# Altium PCB PCB1.PcbDoc (part 1 of 3)
Units mm, origin at the board's own origin, x right, y up, seen from the top; angles counter-clockwise.
Board outline 145 x 122 mm, 4 copper layers (Top Layer, Middle Layer 1, Middle Layer 2, Bottom Layer), stack 1.466 mm thick; 149 components, 242 nets, 995 pads, 740 vias.
Unrouted connection lines stored in the file: 53.
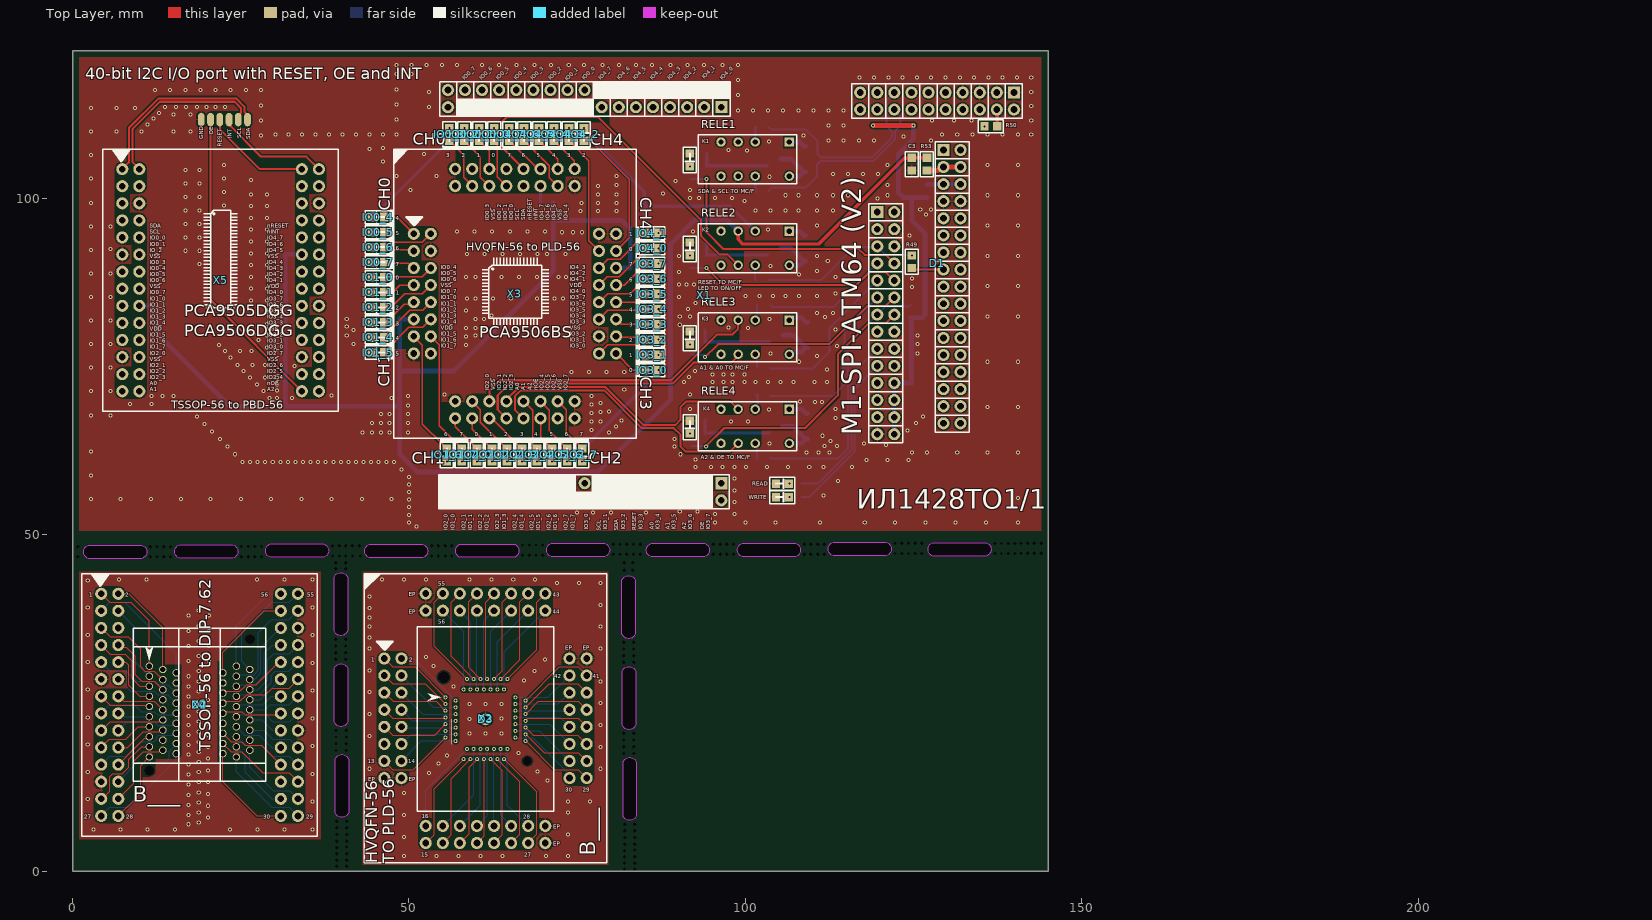
[diagram p0: Top Layer view]
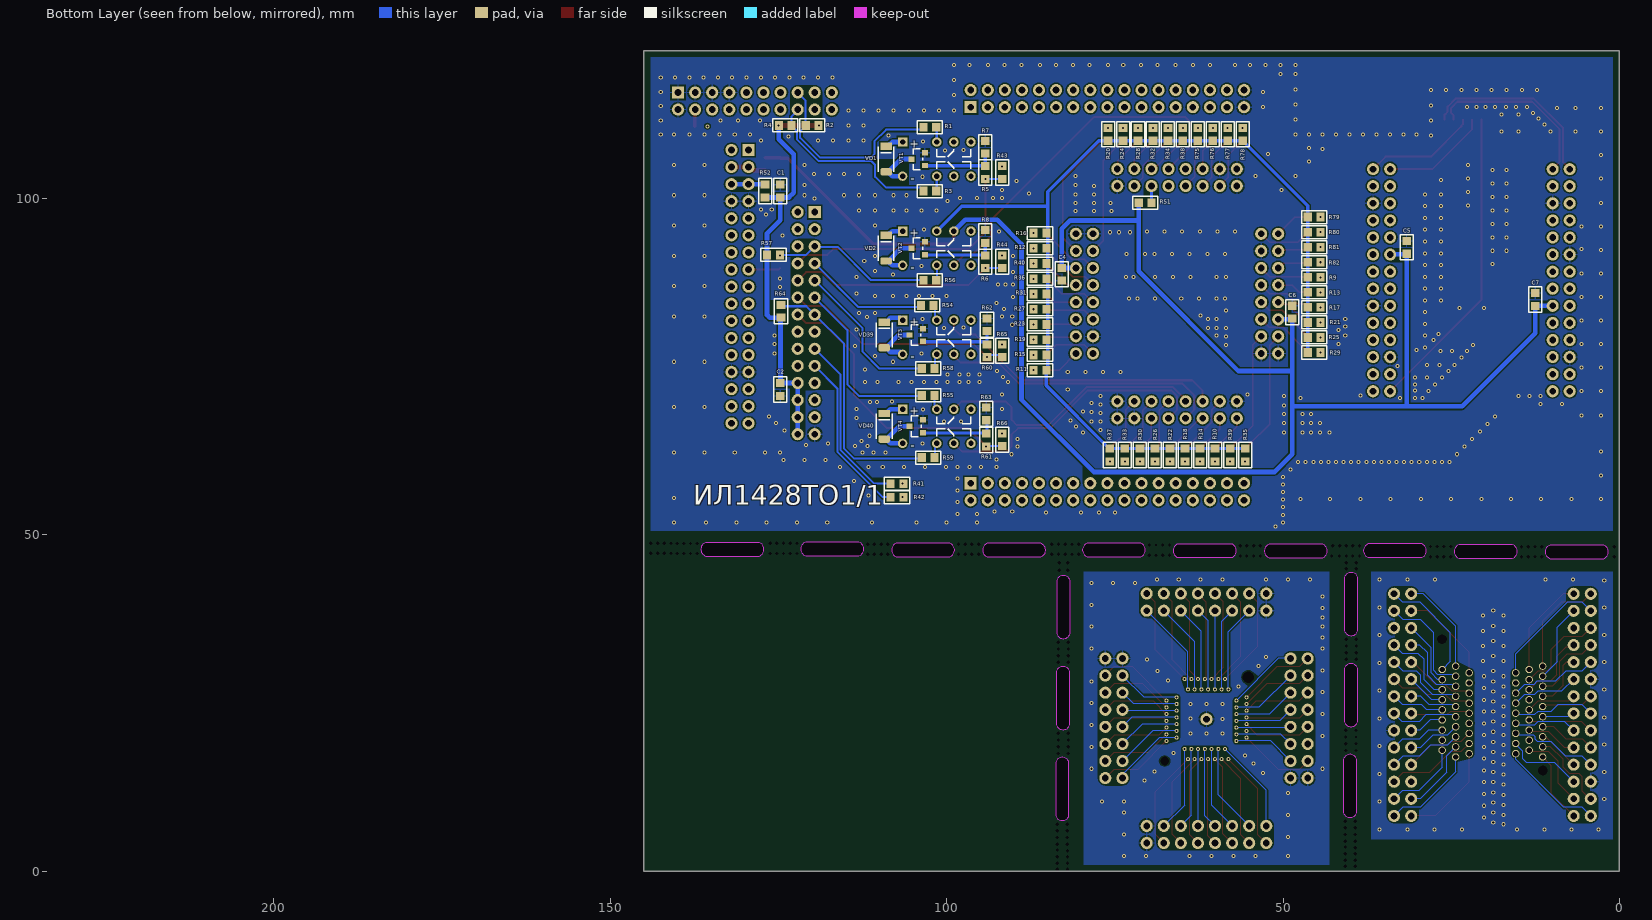
[diagram p1: Bottom Layer view, seen from below]
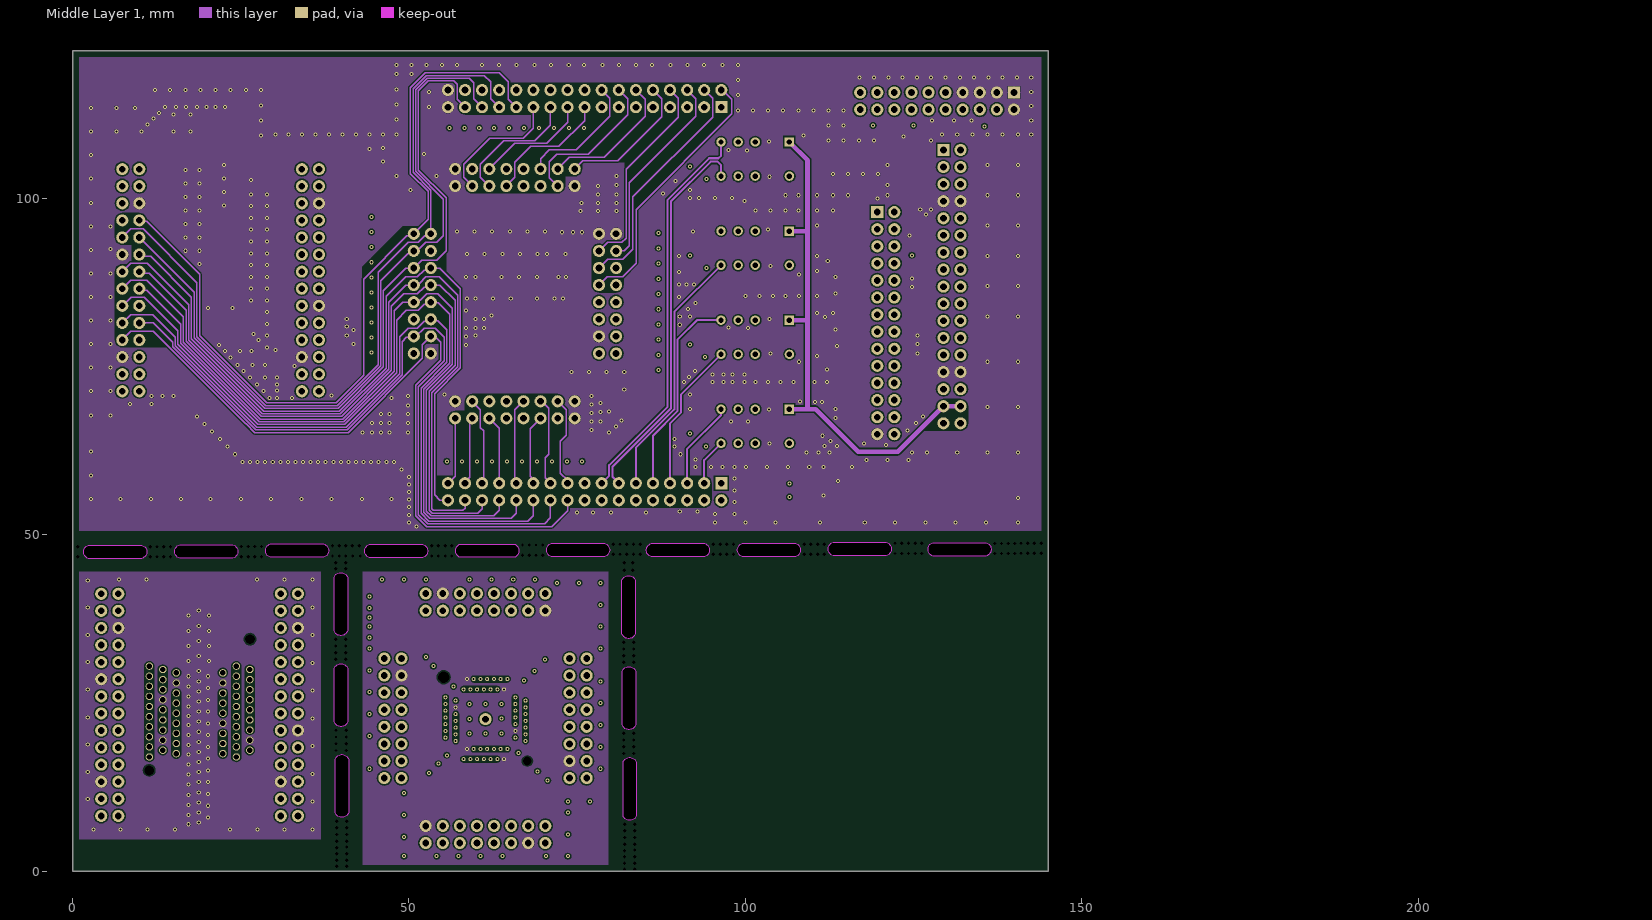
[diagram p2: Middle Layer 1]
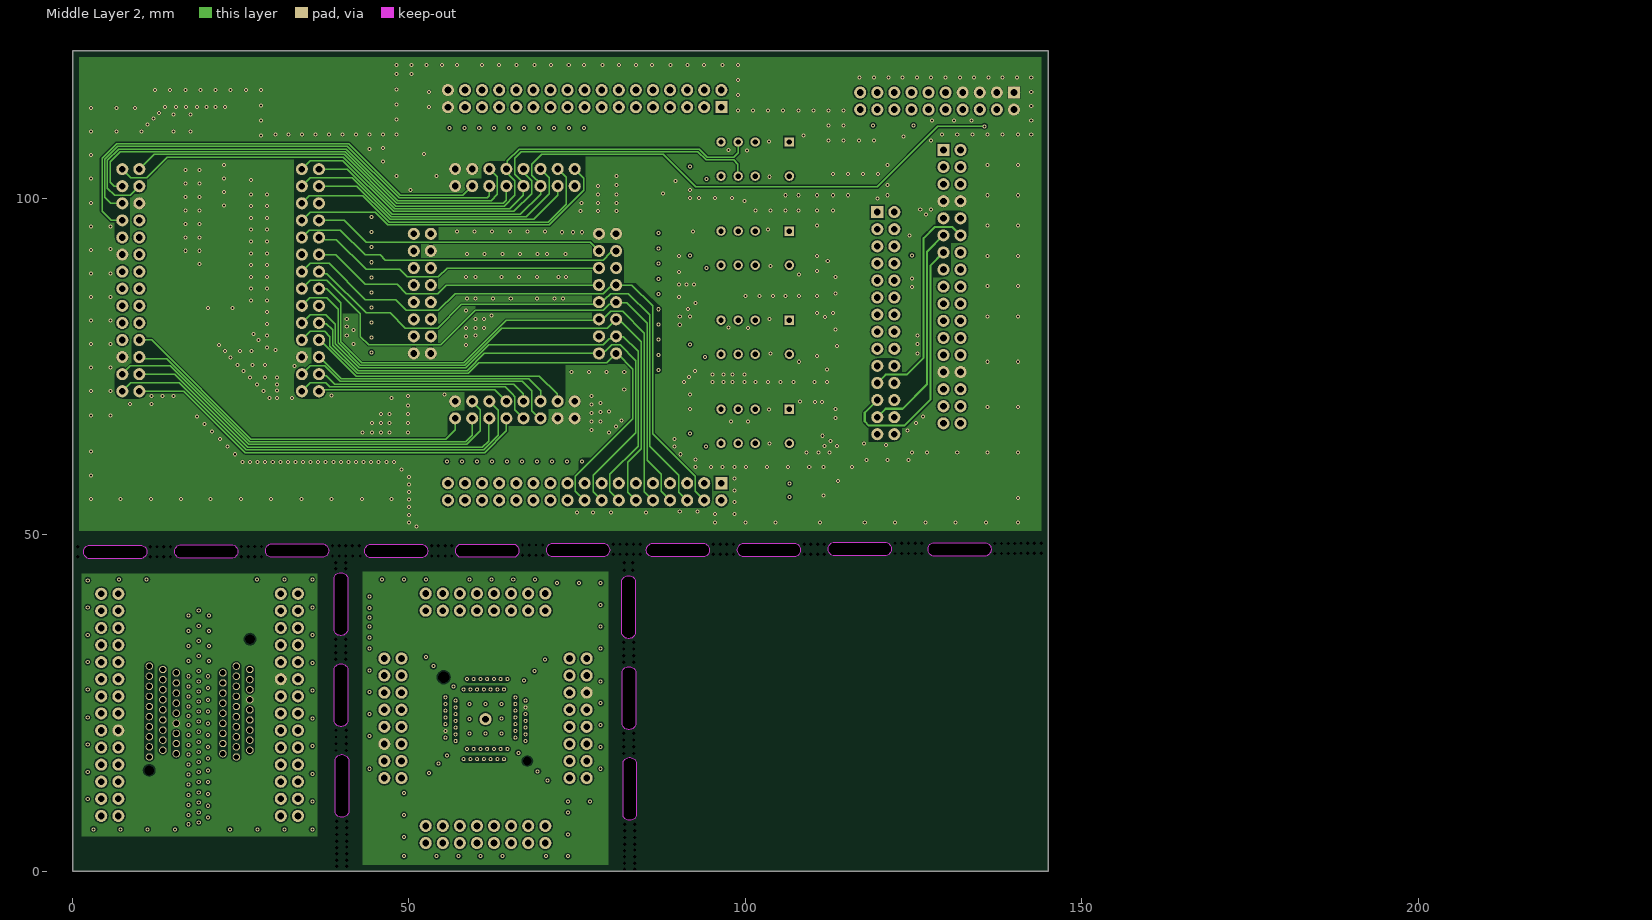
[diagram p3: Middle Layer 2]

## Layer stack, top to bottom
Top Solder: solder mask 0.025, Solder Resist, Dk 4
Top Layer: signal copper 0.018
Dielectric 2: prepreg 0.115, FR4 PR, Dk 4.2
Middle Layer 1: signal copper 0.018
Dielectric 1: core 1.164, FR4 Tg150, Dk 4.6
Middle Layer 2: signal copper 0.018
Dielectric 3: prepreg 0.115, FR4 PR, Dk 4.2
Bottom Layer: signal copper 0.018
Bottom Solder: solder mask 0.025, Solder Resist, Dk 4

## Board outline
0,0 145,0 145,122 0,122
cut-out: 83.815,8.273 cw(c82.815,8.615) 81.815,8.273 81.815,16.217 cw(c82.815,15.875) 83.815,16.217
cut-out: 83.69,21.773 cw(c82.69,22.115) 81.69,21.773 81.69,29.717 cw(c82.69,29.375) 83.69,29.717
cut-out: 83.653,35.307 cw(c82.653,35.649) 81.653,35.307 81.653,43.252 cw(c82.653,42.91) 83.653,43.252
cut-out: 135.82,48.869 cw(c135.478,47.869) 135.82,46.869 127.875,46.869 cw(c128.217,47.869) 127.875,48.869
cut-out: 93.945,48.744 cw(c93.603,47.744) 93.945,46.744 86,46.744 cw(c86.342,47.744) 86,48.744
cut-out: 107.479,48.781 cw(c107.137,47.781) 107.479,46.781 99.535,46.781 cw(c99.877,47.781) 99.535,48.781
cut-out: 120.979,48.906 cw(c120.637,47.906) 120.979,46.906 113.035,46.906 cw(c113.377,47.906) 113.035,48.906
cut-out: 52.07,48.619 cw(c51.728,47.619) 52.07,46.619 44.125,46.619 cw(c44.467,47.619) 44.125,48.619
cut-out: 65.604,48.656 cw(c65.262,47.656) 65.604,46.656 57.66,46.656 cw(c58.002,47.656) 57.66,48.656
cut-out: 79.104,48.781 cw(c78.762,47.781) 79.104,46.781 71.16,46.781 cw(c71.502,47.781) 71.16,48.781
cut-out: 37.335,48.664 cw(c36.993,47.664) 37.335,46.664 29.39,46.664 cw(c29.732,47.664) 29.39,48.664
cut-out: 23.835,48.539 cw(c23.493,47.539) 23.835,46.539 15.89,46.539 cw(c16.232,47.539) 15.89,48.539
cut-out: 10.3,48.502 cw(c9.958,47.502) 10.3,46.502 2.356,46.502 cw(c2.698,47.502) 2.356,48.502
cut-out: 40.864,35.752 cw(c39.864,36.094) 38.864,35.752 38.864,43.696 cw(c39.864,43.354) 40.864,43.696
cut-out: 40.901,22.217 cw(c39.901,22.559) 38.901,22.217 38.901,30.162 cw(c39.901,29.82) 40.901,30.162
cut-out: 41.026,8.717 cw(c40.026,9.059) 39.026,8.717 39.026,16.662 cw(c40.026,16.32) 41.026,16.662

## Design rules (kind name [scope] priority, off if disabled: settings)
Clearance [All] p1: gap=0.2 ignorepadtopadclearanceinfootprint=FALSE except(0: Arc-Hole Track-Hole SMDPad-Hole THPad-Hole Via-Hole Fill-Hole Poly-Hole Region-Hole Text-Hole; 0.1: Arc-SMDPad Arc-THPad Arc-Via Arc-Fill Arc-Region Arc-Text Track-SMDPad Track-THPad Track-Via Track-Fill Track-Region Track-Text)
ComponentClearance [All] p1: gap=0 collisioncheckmode=3 verticalgap=0 showdistances=FALSE
HoleToHoleClearance [All] p1: gap=0.2 allowstackedmicrovias=TRUE
MinimumSolderMaskSliver [All] p1: minsoldermaskwidth=0.15
PolygonConnect [OnLayer('Top Layer') OR OnLayer('Bottom Layer')] p1: thpad.connectstyle=Relief thpad.reliefconductorwidth=0.254 thpad.reliefentries=4 thpad.polygonreliefangle="90 Angle" thpad.airgapwidth=0.254 smdpad.connectstyle=Relief smdpad.reliefconductorwidth=0.254 smdpad.reliefentries=4 smdpad.polygonreliefangle="90 Angle" smdpad.airgapwidth=0.254 via.connectstyle=Direct via.reliefconductorwidth=0.254 via.reliefentries=4 via.polygonreliefangle="90 Angle" via.airgapwidth=0.254
RoutingVias [All] p1: holewidth=0.3 width=0.6 viastyle="Through Hole" minholewidth=0.3 minwidth=0.6 maxholewidth=0.6 maxwidth=1.2
SilkToSilkClearance [All] p1: silktosilkclearance=0
SilkToSolderMaskClearance [IsPad] p1: minsilkscreentomaskgap=0 clearancetoexposedcopper=TRUE
SolderMaskExpansion [All] p1: expansion=0.102 istentingtop=FALSE
Width [All] p1: maxlimit=0.7 minlimit=0.1 preferedwidth=0.3
25 further rules are at their usual default settings.

## Classes and differential pairs
component class UCP_s21: D3 X2 X3 X4 X5
component class RELE: K1 K2 K3 K4 R1 R2 R3 R4 R5 R6 R7 R8 R54 R55 R56 R57 R58 R59 R60 R61 R62 R63 R64 VD1 VD2 VD39 VD40 VT1 VT2 VT3 VT4
component class "Main Scheme": C1 C2 C3 C4 C5 C6 C7 D1 KP1 KP2 KP3 KP4 KP5 KP6 R49 R50 R51 R52 R53
component class LEDS: IO2_4 IO2_5 IO2_6 IO2_7 IO3_0 IO3_1 R9 R10 R11 R12 R13 R14 R15 R16 R17 R18 R19 R20 R21 R22 R23 R24 R25 R26 R27 R28 R29 R30 R31 R32 R33 R34 R35 R36 R37 R38 R39 R40 R41 R42 R43 R44 R65 R66 R75 R76 R77 R78 R79 R80 R81 R82 VD3 VD4 VD6 VD7 VD8 VD10 VD11 VD12 VD13 VD14 VD15 VD16 VD17 VD18 VD19 VD21 VD22 VD23 VD25 VD26 VD27 VD29 VD30 VD31 VD33 VD34 VD35 VD36 VD37 VD38 VD41 VD42 VD43 VD44 VD45 VD46 VD47 VD48 VD49 VD50
component class FK: X1

## Components (designator, comment, footprint, x,y, rotation, side; value= is the part's Value field where it differs from the comment)
C1 "10uF" 0805 124.75,101.125 r90 bottom
C2 "0.1uF" 0805 124.75,71.625 r270 bottom
C3 "10uF" 0805 124.75,105.125 r270 top
C4 "0.1uF" 0805 82.875,88.75 r270 bottom
C5 "0.1uF" 0805 31.625,92.75 r90 bottom
C6 "0.1uF" 0805 48.625,83.125 r90 bottom
C7 "0.1uF" 0805 12.5,85 r90 bottom
D1 "M1-SPI-ATM64(V2)" M1-SPI-ATM64(V2) 128.5,90.375 r270 top locked
D2 "PCA9505 TSSOP-56" OTS-56(64)-0.5-02 18.875,24.75 r0 top locked
D3 "PCA9506BS HVQFN56" 56QN50S18080 61.375,22.625 r90 top locked
GND "Contact" Contact 19.125,111.75 r90 top (schematic designator KP4)
INT "Contact" Contact 23.25,111.75 r90 top (schematic designator KP1)
IO0_0 "LED(0805)" 0805(LED) 62.667,109.55 r270 top (schematic designator VD43)
IO0_1 "LED(0805)" 0805(LED) 60.444,109.55 r270 top (schematic designator VD44)
IO0_2 "LED(0805)" 0805(LED) 58.222,109.55 r270 top (schematic designator VD45)
IO0_3 "LED(0805)" 0805(LED) 56,109.55 r270 top (schematic designator VD46)
IO0_4 "LED(0805)" 0805(LED) 45.375,97.25 r0 top (schematic designator VD47)
IO0_5 "LED(0805)" 0805(LED) 45.375,95.014 r0 top (schematic designator VD48)
IO0_6 "LED(0805)" 0805(LED) 45.375,92.778 r0 top (schematic designator VD49)
IO0_7 "LED(0805)" 0805(LED) 45.375,90.542 r0 top (schematic designator VD50)
IO1_0 "LED(0805)" 0805(LED) 45.375,88.306 r0 top (schematic designator VD3)
IO1_1 "LED(0805)" 0805(LED) 45.375,86.069 r0 top (schematic designator VD7)
IO1_2 "LED(0805)" 0805(LED) 45.375,83.833 r0 top (schematic designator VD11)
IO1_3 "LED(0805)" 0805(LED) 45.375,81.597 r0 top (schematic designator VD15)
IO1_4 "LED(0805)" 0805(LED) 45.375,79.361 r0 top (schematic designator VD19)
IO1_5 "LED(0805)" 0805(LED) 45.375,77.125 r0 top (schematic designator VD23)
IO1_6 "LED(0805)" 0805(LED) 55.625,61.897 r90 top (schematic designator VD27)
IO1_7 "LED(0805)" 0805(LED) 57.861,61.897 r90 top (schematic designator VD31)
IO2_0 "LED(0805)" 0805(LED) 60.097,61.897 r90 top (schematic designator VD4)
IO2_1 "LED(0805)" 0805(LED) 62.333,61.897 r90 top (schematic designator VD8)
IO2_2 "LED(0805)" 0805(LED) 64.569,61.897 r90 top (schematic designator VD12)
IO2_3 "LED(0805)" 0805(LED) 66.806,61.897 r90 top (schematic designator VD16)
IO2_4 "LED(0805)" 0805(LED) 69.042,61.897 r90 top (schematic designator VD20)
IO2_5 "LED(0805)" 0805(LED) 71.278,61.897 r90 top (schematic designator VD24)
IO2_6 "LED(0805)" 0805(LED) 73.514,61.897 r90 top (schematic designator VD28)
IO2_7 "LED(0805)" 0805(LED) 75.75,61.897 r90 top (schematic designator VD32)
IO3_0 "LED(0805)" 0805(LED) 86.125,74.5 r180 top (schematic designator VD5)
IO3_1 "LED(0805)" 0805(LED) 86.125,76.764 r180 top (schematic designator VD9)
IO3_2 "LED(0805)" 0805(LED) 86.125,79.028 r180 top (schematic designator VD13)
IO3_3 "LED(0805)" 0805(LED) 86.125,81.292 r180 top (schematic designator VD17)
IO3_4 "LED(0805)" 0805(LED) 86.125,83.556 r180 top (schematic designator VD21)
IO3_5 "LED(0805)" 0805(LED) 86.125,85.819 r180 top (schematic designator VD25)
IO3_6 "LED(0805)" 0805(LED) 86.125,88.083 r180 top (schematic designator VD29)
IO3_7 "LED(0805)" 0805(LED) 86.125,90.347 r180 top (schematic designator VD33)
IO4_0 "LED(0805)" 0805(LED) 86.125,92.611 r180 top (schematic designator VD6)
IO4_1 "LED(0805)" 0805(LED) 86.125,94.875 r180 top (schematic designator VD10)
IO4_2 "LED(0805)" 0805(LED) 76,109.55 r270 top (schematic designator VD14)
IO4_3 "LED(0805)" 0805(LED) 73.778,109.55 r270 top (schematic designator VD18)
IO4_4 "LED(0805)" 0805(LED) 71.556,109.55 r270 top (schematic designator VD22)
IO4_5 "LED(0805)" 0805(LED) 69.333,109.55 r270 top (schematic designator VD26)
IO4_6 "LED(0805)" 0805(LED) 67.111,109.55 r270 top (schematic designator VD30)
IO4_7 "LED(0805)" 0805(LED) 64.889,109.55 r270 top (schematic designator VD34)
K1 "V23079A1001B301 TE" V23079A1001B301 100.25,105.875 r180 top locked
K2 "V23079A1001B301 TE" V23079A1001B301 100.25,92.636 r180 top locked
K3 "V23079A1001B301 TE" V23079A1001B301 100.25,79.396 r180 top locked
K4 "V23079A1001B301 TE" V23079A1001B301 100.25,66.157 r180 top locked
OE "Contact" Contact 20.5,111.75 r90 top (schematic designator KP6)
R1 "100" 0805 102.5,110.625 r0 bottom
R2 "10k" 0805 120,110.875 r180 bottom
R3 "100" 0805 102.5,101.125 r0 bottom
R4 "10k" 0805 124,110.875 r0 bottom
R5 "4.7k" 0805 94.25,103.875 r90 bottom
R6 "4.7k" 0805 94.25,90.625 r90 bottom
R7 "20k" 0805 94.25,107.625 r90 bottom
R8 "20k" 0805 94.25,94.375 r90 bottom
R9 "2.2k" 0805 45.375,88.306 r180 bottom
R10 "2.2k" 0805 60.097,61.897 r270 bottom
R11 "2.2k" 0805 86.125,74.5 r0 bottom
R12 "2.2k" 0805 86.125,92.611 r0 bottom
R13 "2.2k" 0805 45.375,86.069 r180 bottom
R14 "2.2k" 0805 62.333,61.897 r270 bottom
R15 "2.2k" 0805 86.125,76.764 r0 bottom
R16 "2.2k" 0805 86.125,94.875 r0 bottom
R17 "2.2k" 0805 45.375,83.833 r180 bottom
R18 "2.2k" 0805 64.569,61.897 r270 bottom
R19 "2.2k" 0805 86.125,79.028 r0 bottom
R20 "2.2k" 0805 76,109.55 r90 bottom
R21 "2.2k" 0805 45.375,81.597 r180 bottom
R22 "2.2k" 0805 66.806,61.897 r270 bottom
R23 "2.2k" 0805 86.125,81.292 r0 bottom
R24 "2.2k" 0805 73.778,109.55 r90 bottom
R25 "2.2k" 0805 45.375,79.361 r180 bottom
R26 "2.2k" 0805 69.042,61.897 r270 bottom
R27 "2.2k" 0805 86.125,83.556 r0 bottom
R28 "2.2k" 0805 71.556,109.55 r90 bottom
R29 "2.2k" 0805 45.375,77.125 r180 bottom
R30 "2.2k" 0805 71.278,61.897 r270 bottom
R31 "2.2k" 0805 86.125,85.819 r0 bottom
R32 "2.2k" 0805 69.333,109.55 r90 bottom
R33 "2.2k" 0805 73.514,61.897 r270 bottom
R34 "2.2k" 0805 67.111,109.55 r90 bottom
R35 "2.2k" 0805 55.625,61.897 r270 bottom
R36 "2.2k" 0805 86.125,88.083 r0 bottom
R37 "2.2k" 0805 75.75,61.897 r270 bottom
R38 "2.2k" 0805 64.889,109.55 r90 bottom
R39 "2.2k" 0805 57.861,61.897 r270 bottom
R40 "2.2k" 0805 86.125,90.347 r0 bottom
R41 "2.2k" 0805 107.37,57.625 r180 bottom
R42 "2.2k" 0805 107.37,55.625 r180 bottom
R43 "2.2k" 0805 91.75,103.875 r90 bottom
R44 "2.2k" 0805 91.75,90.625 r90 bottom
R49 "100" 0805 124.75,90.625 r270 top
R50 "100" 0805 136.5,110.75 r180 top
R51 "10k" 0805 70.5,99.375 r0 bottom
R52 "1" 0805 127,101.125 r270 bottom
R53 "1" 0805 127,105.125 r90 top
R54 "100" 0805 102.875,84.125 r0 bottom
R55 "100" 0805 102.75,70.75 r0 bottom
R56 "100" 0805 102.5,87.875 r0 bottom
R57 "10k" 0805 125.75,91.625 r0 bottom
R58 "100" 0805 102.75,74.75 r0 bottom
R59 "100" 0805 102.75,61.5 r0 bottom
R60 "4.7k" 0805 94,77.375 r90 bottom
R61 "4.7k" 0805 94.125,64.125 r90 bottom
R62 "20k" 0805 94,81.25 r90 bottom
R63 "20k" 0805 94.125,68 r90 bottom
R64 "10k" 0805 124.625,83.25 r270 bottom
R65 "2.2k" 0805 91.75,77.396 r90 bottom
R66 "2.2k" 0805 91.75,64.157 r90 bottom
R75 "2.2k" 0805 62.667,109.55 r90 bottom
R76 "2.2k" 0805 60.444,109.55 r90 bottom
R77 "2.2k" 0805 58.222,109.55 r90 bottom
R78 "2.2k" 0805 56,109.55 r90 bottom
R79 "2.2k" 0805 45.375,97.25 r180 bottom
R80 "2.2k" 0805 45.375,95.014 r180 bottom
R81 "2.2k" 0805 45.375,92.778 r180 bottom
R82 "2.2k" 0805 45.375,90.542 r180 bottom
READ "LED(0805)" 0805(LED) 105.5,57.625 r180 top (schematic designator VD35)
RELE1 "LED(0805)" 0805(LED) 91.75,105.745 r90 top (schematic designator VD37)
RELE2 "LED(0805)" 0805(LED) 91.75,92.506 r90 top (schematic designator VD38)
RELE3 "LED(0805)" 0805(LED) 91.75,79.267 r90 top (schematic designator VD41)
RELE4 "LED(0805)" 0805(LED) 91.75,66.027 r90 top (schematic designator VD42)
RESET "Contact" Contact 21.875,111.75 r90 top (schematic designator KP5)
SCL "Contact" Contact 24.625,111.75 r90 top (schematic designator KP2)
SDA "Contact" Contact 26,111.75 r90 top (schematic designator KP3)
VD1 "LL4148 NXP" SOD80C 109,105.875 r90 bottom
VD2 "LL4148 NXP" SOD80C 109,92.625 r90 bottom
VD39 "LL4148 NXP" SOD80C 109.293,79.733 r90 bottom
VD40 "LL4148 NXP" SOD80C 109.28,66.157 r90 bottom
VT1 "MMBT5551L" SOT-23 104.25,105.875 r90 bottom
VT2 "MMBT5551L" SOT-23 104.25,92.625 r90 bottom
VT3 "MMBT5551L" SOT-23 104.543,79.733 r90 bottom
VT4 "MMBT5551L" SOT-23 104.53,66.157 r90 bottom
WRITE "LED(0805)" 0805(LED) 105.5,55.625 r180 top (schematic designator VD36)
X1 "FORMULA" FORMULA 84.25,84.375 r0 top locked
X2 "HVQFN-56 to PBD-56" "HVQFN-56 to PD-56" 61.375,22.75 r0 top locked
X3 "HVQFN-56 to PBD-56" "HVQFN-56 to PD-56" 65.75,85.875 r0 top locked
X4 "TSSOP-56 to DIP-7.62" "TSSOP-56 to DIP 7.62" 18.875,24.75 r0 top
X5 "TSSOP-56 to DIP-7.62" "TSSOP-56 to DIP 7.62" 22,87.875 r0 top locked

## Footprints (in the part's own frame and the unit in brackets; to place one, negate y for a bottom-side part, rotate by r counter-clockwise, add the part's x,y. Pads: shape width x height; smd on the part's side, far side on the other; paste and mask are expansions set on the pad)
56QN50S18080 [mm]
  round 0 hole 1.27 unplated: 0(-6.225,-6.225)
  round 0 hole 1.68 unplated: 0(6.225,6.225)
  round 0.6 hole 0.3: 1(3.25,5.955) 2(2.75,4.43) 3(2.25,5.955) 4(1.75,4.43) 5(1.25,5.955) 6(0.75,4.43) 7(0.25,5.955) 8(-0.25,4.43) 9(-0.75,5.955) 10(-1.25,4.43) 11(-1.75,5.955) 12(-2.25,4.43) 13(-2.75,5.955) 14(-3.25,4.43) 15(-5.955,3.25) 16(-4.43,2.75) 17(-5.955,2.25) 18(-4.43,1.75) 19(-5.955,1.25) 20(-4.43,0.75) 21(-5.955,0.25) 22(-4.43,-0.25) 23(-5.955,-0.75) 24(-4.43,-1.25) 25(-5.955,-1.75) 26(-4.43,-2.25) 27(-5.955,-2.75) 28(-4.43,-3.25) 29(-3.25,-5.955) 30(-2.75,-4.43) 31(-2.25,-5.955) 32(-1.75,-4.43) 33(-1.25,-5.955) 34(-0.75,-4.43) 35(-0.25,-5.955) 36(0.25,-4.43) 37(0.75,-5.955) 38(1.25,-4.43) 39(1.75,-5.955) 40(2.25,-4.43) 41(2.75,-5.955) 42(3.25,-4.43) 43(5.955,-3.25) 44(4.43,-2.75) 45(5.955,-2.25) 46(4.43,-1.75) 47(5.955,-1.25) 48(4.43,-0.75) 49(5.955,-0.25) 50(4.43,0.25) 51(5.955,0.75) 52(4.43,1.25) 53(5.955,1.75) 54(4.43,2.25) 55(5.955,2.75) 56(4.43,3.25)
  round 1.8 hole 1: 57(0,0)
  silkscreen extent -13.71,-10.16 13.72,10.16
0805 [mm]
  rect 1.2x1.3 smd: 1(-0.95,0) 2(0.95,0)
  silkscreen extent -1.87,-0.97 1.87,0.97, body extent -1.05,-0.63 0.95,0.63, height 0.55
0805(LED) [mm]
  rect 1.2x1.3 smd: 1(-0.95,0) 2(0.95,0)
  silkscreen extent -1.87,-0.97 1.87,0.97, body extent -1.03,-0.41 1.03,0.5, height 0.85
Contact [mm]
  oval 2x1 smd: 1(0,0)
FORMULA [mm]
  rect 1.8x1.8 hole 1: 1(12.18,29.22) VDDF(12.18,-26.68) VEEF(45.2,22.86)
  round 1.8 hole 1: 2(9.64,29.22) 3(7.1,29.22) 4(4.56,29.22) 5(2.02,29.22) 6(-0.52,29.22) 7(-3.06,29.22) 8(-5.6,29.22) 9(-8.14,29.22) 10(-10.68,29.22) 11(-13.22,29.22) 12(-15.76,29.22) 13(-18.3,29.22) 14(-20.84,29.22) 15(-23.38,29.22) 16(-25.92,29.22) 17(12.18,31.76) 18(9.64,31.76) 19(7.1,31.76) 20(4.56,31.76) 21(2.02,31.76) 22(-0.52,31.76) 23(-3.06,31.76) 24(-5.6,31.76) 25(-8.14,31.76) 26(-10.68,31.76) 27(-13.22,31.76) 28(-15.76,31.76) 29(-18.3,31.76) 30(-20.84,31.76) 31(-23.38,31.76) 32(-25.92,31.76) 33(-28.46,-29.22) 34(-25.92,-29.22) 35(-23.38,-29.22) 36(-20.84,-29.22) 37(-18.3,-29.22) 38(-15.76,-29.22) 39(-13.22,-29.22) 40(-10.68,-29.22) 41(-8.14,-29.22) 42(-5.6,-29.22) 43(-3.06,-29.22) 44(-0.52,-29.22) 45(2.02,-29.22) 46(4.56,-29.22) 47(7.1,-29.22) 48(9.64,-29.22) 49(-28.46,-26.68) 50(-25.92,-26.68) 51(-23.38,-26.68) 52(-20.84,-26.68) 53(-18.3,-26.68) 54(-15.76,-26.68) 55(-13.22,-26.68) 56(-10.68,-26.68) 57(-8.14,-26.68) 58(-5.6,-26.68) 59(-3.06,-26.68) 60(-0.52,-26.68) 61(2.02,-26.68) 62(4.56,-26.68) 63(7.1,-26.68) 64(9.64,-26.68) +5V(45.2,-15.24) +5V(47.74,-15.24) +5V_VCCF(45.2,20.32) +5V_VCCS(47.74,20.32) +5V_VDDF(45.2,17.78) +5V_VDDS(47.74,17.78) +12V(45.2,-12.7) +12V(47.74,-12.7) -12V(45.2,-17.78) -12V(47.74,-17.78) GND(-28.46,29.22) GND(-28.46,31.76) GND(45.2,-10.16) GND(45.2,15.24) GND(47.74,-10.16) GND(47.74,15.24) IN-OUT1(47.74,10.16) IN-OUT2(47.74,7.62) IN-OUT3(47.74,5.08) IN-OUT4(47.74,2.54) IN-OUT5(47.74,0) IN-OUT6(47.74,-2.54) IN-OUT7(47.74,-5.08) IN-OUT8(47.74,-7.62) NC(45.2,12.7) NC(47.74,12.7) OUT1(45.2,10.16) OUT2(45.2,7.62) OUT3(45.2,5.08) OUT4(45.2,2.54) OUT5(45.2,0) OUT6(45.2,-2.54) OUT7(45.2,-5.08) OUT8(45.2,-7.62) VDDS(12.18,-29.22) VEES(47.74,22.86)
  silkscreen extent -29.8,-30.51 49.02,32.97, body extent -29.79,-30.4 48.98,32.92, height 3
"HVQFN-56 to PD-56" [mm]
  round 1.8 hole 1: 1(-15.04,8.89) 2(-12.5,8.89) 3(-15.04,6.35) 4(-12.5,6.35) 5(-15.04,3.81) 6(-12.5,3.81) 7(-15.04,1.27) 8(-12.5,1.27) 9(-15.04,-1.27) 10(-12.5,-1.27) 11(-15.04,-3.81) 12(-12.5,-3.81) 13(-15.04,-6.35) 14(-12.5,-6.35) 15(-8.89,-18.54) 16(-8.89,-16) 17(-6.35,-18.54) 18(-6.35,-16) 19(-3.81,-18.54) 20(-3.81,-16) 21(-1.27,-18.54) 22(-1.27,-16) 23(1.27,-18.54) 24(1.27,-16) 25(3.81,-18.54) 26(3.81,-16) 27(6.35,-18.54) 28(6.35,-16) 29(15.04,-8.89) 30(12.5,-8.89) 31(15.04,-6.35) 32(12.5,-6.35) 33(15.04,-3.81) 34(12.5,-3.81) 35(15.04,-1.27) 36(12.5,-1.27) 37(15.04,1.27) 38(12.5,1.27) 39(15.04,3.81) 40(12.5,3.81) 41(15.04,6.35) 42(12.5,6.35) 43(8.89,18.54) 44(8.89,16) 45(6.35,18.54) 46(6.35,16) 47(3.81,18.54) 48(3.81,16) 49(1.27,18.54) 50(1.27,16) 51(-1.27,18.54) 52(-1.27,16) 53(-3.81,18.54) 54(-3.81,16) 55(-6.35,18.54) 56(-6.35,16) 57(-15.04,-8.89) 57(-12.5,-8.89) 57(-8.89,16) 57(-8.89,18.54) 57(8.89,-18.54) 57(8.89,-16) 57(12.5,8.89) 57(15.04,8.89)
  silkscreen extent -18,-21.5 18,21.5, body extent -16.25,-19.75 16.25,19.75, height 2.8
M1-SPI-ATM64(V2) [mm]
  rect 1.8x1.8 hole 1: 1X2(-25.4,11.43) 1X3(-7.62,-8.89)
  round 1.8 hole 1: 2X2(-22.86,11.43) 2X3(-7.62,-6.35) 3X2(-25.4,8.89) 3X3(-5.08,-8.89) 4X2(-22.86,8.89) 4X3(-5.08,-6.35) 5X2(-25.4,6.35) 5X3(-2.54,-8.89) 6X2(-22.86,6.35) 6X3(-2.54,-6.35) 7X2(-25.4,3.81) 7X3(0,-8.89) 8X2(-22.86,3.81) 8X3(0,-6.35) 9X2(-25.4,1.27) 9X3(2.54,-8.89) 10X2(-22.86,1.27) 10X3(2.54,-6.35) 11X2(-25.4,-1.27) 11X3(5.08,-8.89) 12X2(-22.86,-1.27) 12X3(5.08,-6.35) 13X2(-25.4,-3.81) 13X3(7.62,-8.89) 14X2(-22.86,-3.81) 14X3(7.62,-6.35) 15X2(-25.4,-6.35) 15X3(10.16,-8.89) 16X2(-22.86,-6.35) 16X3(10.16,-6.35) 17X2(-25.4,-8.89) 17X3(12.7,-8.89) 18X2(-22.86,-8.89) 18X3(12.7,-6.35) 19X2(-25.4,-11.43) 19X3(15.24,-8.89) 20X2(-22.86,-11.43) 20X3(15.24,-6.35) 21X3(17.78,-8.89) 22X3(17.78,-6.35) 23X3(20.32,-8.89) 24X3(20.32,-6.35) 25X3(22.86,-8.89) 26X3(22.86,-6.35) 27X3(25.4,-8.89) 28X3(25.4,-6.35)
  silkscreen extent -26.67,-12.7 26.67,12.7
OTS-56(64)-0.5-02 [mm]
  round 0 hole 1.45 unplated: 0(-7.5,-9.75) 0(7.5,9.75)
  round 1.1 hole 0.8: 1(-7.465,5.75) 2(-5.465,5.25) 3(-3.465,4.75) 4(-7.465,4.25) 5(-5.465,3.75) 6(-3.465,3.25) 7(-7.465,2.75) 8(-5.465,2.25) 9(-3.465,1.75) 10(-7.465,1.25) 11(-5.465,0.75) 12(-3.465,0.25) 13(-7.465,-0.25) 14(-5.465,-0.75) 15(-3.465,-1.25) 16(-7.465,-1.75) 17(-5.465,-2.25) 18(-3.465,-2.75) 19(-7.465,-3.25) 20(-5.465,-3.75) 21(-3.465,-4.25) 22(-7.465,-4.75) 23(-5.465,-5.25) 24(-3.465,-5.75) 25(-7.465,-6.25) 26(-5.465,-6.75) 27(-3.465,-7.25) 28(-7.465,-7.75) 29(5.465,-7.75) 30(3.465,-7.25) 31(7.465,-6.75) 32(5.465,-6.25) 33(3.465,-5.75) 34(7.465,-5.25) 35(5.465,-4.75) 36(3.465,-4.25) 37(7.465,-3.75) 38(5.465,-3.25) 39(3.465,-2.75) 40(7.465,-2.25) 41(5.465,-1.75) 42(3.465,-1.25) 43(7.465,-0.75) 44(5.465,-0.25) 45(3.465,0.25) 46(7.465,0.75) 47(5.465,1.25) 48(3.465,1.75) 49(7.465,2.25) 50(5.465,2.75) 51(3.465,3.25) 52(7.465,3.75) 53(5.465,4.25) 54(3.465,4.75) 55(7.465,5.25) 56(5.465,5.75)
  silkscreen extent -9.85,-11.35 9.85,11.35
SOD80C [mm]
  rrect50% 1.1x1.7 smd: 1(-1.9,0)
  rect 1.1x1.7 smd: 2(1.9,0)
  silkscreen extent -1.85,-1.17 1.85,1.17, body extent -1.9,-0.8 1.8,0.8, height 1.55
SOT-23 [mm]
  rect 0.8x0.9 smd: 1(-0.95,-1) 1(-0.95,-1) 2(0.95,-1) 2(0.95,-1) 3(0,1) 3(0,1)
  silkscreen extent -1.55,-0.72 1.55,0.7, body extent -1.5,-1.25 1.5,1.25, height 1.05
"TSSOP-56 to DIP 7.62" [mm]
  round 1.8 hole 1: 1(-14.62,16.51) 2(-12.08,16.51) 3(-14.62,13.97) 4(-12.08,13.97) 5(-14.62,11.43) 6(-12.08,11.43) 7(-14.62,8.89) 8(-12.08,8.89) 9(-14.62,6.35) 10(-12.08,6.35) 11(-14.62,3.81) 12(-12.08,3.81) 13(-14.62,1.27) 14(-12.08,1.27) 15(-14.62,-1.27) 16(-12.08,-1.27) 17(-14.62,-3.81) 18(-12.08,-3.81) 19(-14.62,-6.35) 20(-12.08,-6.35) 21(-14.62,-8.89) 22(-12.08,-8.89) 23(-14.62,-11.43) 24(-12.08,-11.43) 25(-14.62,-13.97) 26(-12.08,-13.97) 27(-14.62,-16.51) 28(-12.08,-16.51) 29(14.62,-16.51) 30(12.08,-16.51) 31(14.62,-13.97) 32(12.08,-13.97) 33(14.62,-11.43) 34(12.08,-11.43) 35(14.62,-8.89) 36(12.08,-8.89) 37(14.62,-6.35) 38(12.08,-6.35) 39(14.62,-3.81) 40(12.08,-3.81) 41(14.62,-1.27) 42(12.08,-1.27) 43(14.62,1.27) 44(12.08,1.27) 45(14.62,3.81) 46(12.08,3.81) 47(14.62,6.35) 48(12.08,6.35) 49(14.62,8.89) 50(12.08,8.89) 51(14.62,11.43) 52(12.08,11.43) 53(14.62,13.97) 54(12.08,13.97) 55(14.62,16.51) 56(12.08,16.51)
  silkscreen extent -17.5,-19.5 17.5,19.5, body extent -15.75,-17.79 15.75,18.27, height 5
V23079A1001B301 [mm]
  rect 1.4x1.4 hole 0.8: 1(-6.3,-2.54)
  round 1.4 hole 0.8: 3(-1.22,-2.54) 4(1.32,-2.54) 5(3.86,-2.54) 8(3.86,2.54) 9(1.32,2.54) 10(-1.22,2.54) 12(-6.3,2.54)
  silkscreen extent -7.4,-3.63 7.25,3.63, body extent -7.25,-3.6 7.25,3.6, height 9.4

## Part data
C1 C2 C3 C4 C5 C6 C7: library part C0805, ComponentHeigt=1.3, Firme=AVX, KIND=Конденсатор, Leadform=SMD, Packaging=0805
D2: library part "PCA9505DGG & PCA9506DGG"
D3: library part PCA9506BS
R1 R2 R3 R4 R5 R6 R7 R8 R9 R10 R11 R12 R13 R14 R15 R16 R17 R18 R19 R20 R21 R22 R23 R24 R25 R26 R27 R28 R29 R30 R31 R32 R33 R34 R35 R36 R37 R38 R39 R40 R41 R42 R43 R44 R49 R50 R51 R52 R53 R54 R55 R56 R57 R58 R59 R60 R61 R62 R63 R64 R65 R66 R75 R76 R77 R78 R79 R80 R81 R82: library part "R0805 Yageo", ComponentHeigt=0.6, Firme=Yageo, KIND=Резистор, Leadform=SMD, Packaging=0805
D1: ComponentHeigt=5.5, Name=Вилка, Specification="Вилка PLD2-2 *", Typ=PLD2-2
IO0_0 IO0_1 IO0_2 IO0_3 IO0_4 IO0_5 IO0_6 IO0_7 IO1_0 IO1_1 IO1_2 IO1_3 IO1_4 IO1_5 IO1_6 IO1_7 IO2_0 IO2_1 IO2_2 IO2_3 IO2_4 IO2_5 IO2_6 IO2_7 IO3_0 IO3_1 IO3_2 IO3_3 IO3_4 IO3_5 IO3_6 IO3_7 IO4_0 IO4_1 IO4_2 IO4_3 IO4_4 IO4_5 IO4_6 IO4_7 READ RELE1 RELE2 RELE3 RELE4 WRITE: ComponentHeigt=0.75, Firme=Kingbright, KIND="Светодиод L-1154GD Kingbright", Leadform="в отверстия", NN=24003000
VD1 VD2 VD39 VD40: Component Link=http://www.nxp.com, ComponentHeigt=1.6, Firme=NXP, KIND="Диод LL4148 NXP", Leadform=SMD, NN=24009301, Packaging=SOD-80C
VT1 VT2 VT3 VT4: ComponentHeigt=1.1, Firme=ONS, KIND="Транзистор MMBT5551L*G ONS", Leadform=SMD, NN=24007468, Packaging=SOT-23

## Free pads (board coordinates)
  round 0 hole 0.5 unplated: 38(0.75,48.25) 38(12.55,48.25) 38(26.085,48.287) 38(39.625,48.375) 38(40.613,33.502) 38(40.625,45) 38(40.625,45.875) 38(40.65,19.967) 38(40.75,2.625) 38(40.775,6.467) 38(42.625,48.375) 38(54.375,48.375) 38(67.875,48.5) 38(81.375,48.625) 38(83.25,44.75) 38(83.25,45.875) 38(83.402,33.057) 38(83.439,19.523) 38(83.539,2.181) 38(83.564,6.023) 38(84.375,48.625) 38(96.25,48.625) 38(109.75,48.625) 38(123.25,48.75) 38(126.25,48.75) 38(138.07,48.742) 38(141.973,48.767) 38(229.677,32.986) 39(11.55,48.25) 39(25.085,48.287) 39(38.625,48.375) 39(40.613,34.502) 39(40.65,20.967) 39(40.75,3.625) 39(40.775,7.467) 39(53.375,48.375) 39(66.875,48.5) 39(80.375,48.625) 39(83.402,34.057) 39(83.439,20.523) 39(83.539,3.181) 39(83.564,7.023) 39(95.25,48.625) 39(108.75,48.625) 39(122.25,48.75) 39(137.07,48.742) 39(140.973,48.767) 39(228.927,74.111) 41(0.75,46.75) 41(12.55,46.75) 41(13.55,46.75) 41(26.085,46.787) 41(27.085,46.787) 41(39.113,32.502) 41(39.113,33.502) 41(39.125,45) 41(39.125,45.875) 41(39.15,18.967) 41(39.15,19.967) 41(39.25,1.625) 41(39.25,2.625) 41(39.275,5.467) 41(39.275,6.467) 41(39.625,46.875) 41(40.625,46.875) 41(42.75,46.875) 41(54.375,46.875) 41(55.375,46.875) 41(67.875,47) 41(68.875,47) 41(81.375,47.125) 41(81.902,32.057) 41(81.902,33.057) 41(81.939,18.523) 41(81.939,19.523) 41(82,44.75) 41(82,45.875) 41(82.039,1.181) 41(82.039,2.181) 41(82.064,5.023) 41(82.064,6.023) 41(82.375,47.125) 41(84.375,47.125) 41(96.25,47.125) 41(97.25,47.125) 41(109.75,47.125) 41(110.75,47.125) 41(123.25,47.25) 41(124.25,47.25) 41(126.25,47.25) 41(138.07,47.242) 41(139.07,47.242) 41(141.973,47.267) 41(142.973,47.267) 41(229.677,31.361) 42(11.55,46.75) 42(25.085,46.787) 42(38.625,46.875) 42(39.113,34.502) 42(39.15,20.967) 42(39.25,3.5) 42(39.275,7.467) 42(53.375,46.875) 42(66.875,47) 42(80.375,47.125) 42(81.902,34.057) 42(81.939,20.523) 42(82.039,3.056) 42(82.064,7.023) 42(95.25,47.125) 42(108.75,47.125) 42(122.25,47.25) 42(137.07,47.242) 42(140.973,47.267) 42(228.927,72.486) 43(13.55,48.25) 43(14.55,46.75) 43(14.55,48.25) 43(27.085,48.287) 43(28.085,46.787) 43(28.085,48.287) 43(39.113,31.502) 43(39.15,17.967) 43(39.25,0.75) 43(39.275,4.467) 43(40.613,31.502) 43(40.613,32.502) 43(40.625,48.375) 43(40.65,17.967) 43(40.65,18.967) 43(40.75,0.75) 43(40.75,1.625) 43(40.775,4.467) 43(40.775,5.467) 43(41.585,48.412) 43(41.625,46.875) 43(55.375,48.375) 43(56.375,46.875) 43(56.375,48.375) 43(68.875,48.5) 43(69.875,47) 43(69.875,48.5) 43(81.902,31.057) 43(81.939,17.523) 43(82.039,0.306) 43(82.064,4.023) 43(82.375,48.625) 43(83.375,47.125) 43(83.375,48.625) 43(83.402,31.057) 43(83.402,32.057) 43(83.439,17.523) 43(83.439,18.523) 43(83.539,0.306) 43(83.539,1.181) 43(83.564,4.023) 43(83.564,5.023) 43(97.25,48.625) 43(98.25,47.125) 43(98.25,48.625) 43(110.75,48.625) 43(111.75,47.125) 43(111.75,48.625) 43(124.25,48.75) 43(125.25,47.25) 43(125.25,48.75) 43(139.07,48.742) 43(140.07,47.242) 43(140.07,48.742) 43(142.973,48.767) 43(143.973,47.267) 43(143.973,48.767)

## Via types
v1: diameter 0.6, hole 0.3, Top Layer to Bottom Layer, tented both sides, 740 vias

## Nets (pads, with @x,y where several pads share a name; then routed paths per layer and width w, separated by ;. In a path a pad name is that pad's centre, name@x,y a point inside that pad or via, vN(x,y) a via of type N, cw(c..) or ccw(c..) an arc to the next point about the centre after c; other vN are vias at no path point)
+5V_CONST: K1.1 K2.1 K3.1 K4.1 VD1.2 VD2.2 VD39.2 VD40.2 X1.+5V | length 87.7
  Middle Layer 1 w0.7: K3.1@106.55,81.936 109.17,81.936 ; K2.1@106.55,95.165 109.25,95.165 ; K1.1@106.55,108.415 109.25,105.715 109.25,95.165 ; K4.1@106.83,68.697 109.25,68.697 ; 110.46,68.665 116.75,62.375 122.69,62.375 126.75,66.435 X1.+5V@129.45,69.135 X1.+5V@131.99,69.135 ; 110.46,68.697 109.25,68.697 ; 109.25,68.697 109.25,81.936 109.25,82.346 109.25,95.165
  Bottom Layer w0.7: K2.1@106.55,95.165 108.09,95.165 108.5,94.755 108.5,94.725 108.7,94.525 VD2.2@109,94.525 ; K1.1@106.55,108.415 108.09,108.415 108.5,108.005 108.5,107.975 108.7,107.775 VD1.2@109,107.775 ; K4.1@106.83,68.697 108.37,68.697 108.78,68.287 108.78,68.257 108.98,68.057 VD40.2@109.28,68.057 ; K3.1@106.843,82.273 108.383,82.273 108.793,81.863 108.793,81.833 108.993,81.633 VD39.2@109.293,81.633
+5V_VCC: R53.1 X1.+5V_VCCF X1.+5V_VCCS | length 5.2
  Top Layer w0.7: R53.1@127,104.175 128.632,104.175 129.152,104.695 X1.+5V_VCCF@129.45,104.695 X1.+5V_VCCS@131.99,104.695
+5V_VDD: R52.1 X1.+5V_VDDF X1.+5V_VDDS | length 5
  Bottom Layer w0.7: R52.1@127,102.075 127.04,102.115 129.41,102.115 X1.+5V_VDDF@129.45,102.155 X1.+5V_VDDS@131.99,102.155
A0: K3.4 X3.20 X5.27 | length 111.6
  Top Layer w0.3: X3.20@61.94,69.875 61.94,71.44 63.5,73 88.984,73 95.75,79.766 98.016,79.766 98.93,80.68 K3.4@98.93,81.936 ; K3.4@98.621,81.931 98.621,82.246 98.648,82.273 K3.4@99.223,82.273
  Middle Layer 2 w0.2: X5.27@7.38,71.365 8.64,72.625 15.862,72.625 25.837,62.65 61.084,62.65 63.25,64.816 63.25,68.565 X3.20@61.94,69.875
A0_F: K3.5 X1.61 | length 30.5
  Middle Layer 1 w0.3: X1.61@86.27,57.695 86.27,64.774 89.95,68.454 89.95,79.075 92.811,81.936 K3.5@96.39,81.936
A0_KY: D2.27 X4.27 | length 15.5
  Bottom Layer w0.1: X4.27@4.255,8.24 5.515,9.5 8.25,9.5 15.41,16.66 D2.27@15.41,17.5
A0_KY2: D3.20 X2.20 | length 12.7
  Bottom Layer w0.1: X2.20@57.565,6.75 60.625,9.81 D3.20@60.625,18.195
A0_MC: D1.7X3 R54.2 | length 18.6
  Bottom Layer w0.3: R54.2@103.825,84.125 104.075,83.875 113.11,83.875 D1.7X3@119.61,90.375
A1: K3.9 X3.21 X5.28 | length 104.1
  Top Layer w0.3: X3.21@64.48,67.335 63.195,68.62 63.195,70.755 64.941,72.5 89.191,72.5 92.316,75.625 97.935,75.625 K3.9@99.223,76.913
  Middle Layer 2 w0.2: X5.28@9.92,71.365 16.557,71.365 25.672,62.25 61.25,62.25 64.48,65.48 X3.21@64.48,67.335
A1_F: K3.8 X1.62 | length 22.3
  Middle Layer 1 w0.3: X1.62@88.81,57.695 88.81,66.607 90.45,68.247 90.45,70.916 K3.8@96.39,76.856
A1_KY: D2.28 X4.28 | length 10.7
  Top Layer w0.1: X4.28@6.795,8.24 10.125,11.57 10.125,15.715 D2.28@11.41,17
A1_KY2: D3.21 X2.21 | length 12.9
  Top Layer w0.1: X2.21@60.105,4.21 61.155,5.26 61.155,16.64 D3.21@61.125,16.67
A1_MC: D1.9X3 R58.2 | length 23.4
  Bottom Layer w0.3: R58.2@103.7,74.75 110,74.75 112.5,77.25 112.5,80.725 D1.9X3@119.61,87.835
A2: K4.4 X3.22 X5.29 | length 69.5
  Top Layer w0.3: X3.22@64.48,69.875 64.48,70.105 66.375,72 79.207,72 84.832,66.375 89.625,66.375 90.35,67.1 90.35,68.975 91.25,69.875 97.752,69.875 K4.4@98.93,68.697
  Middle Layer 2 w0.2: X5.29@36.62,71.365 36.88,71.625 62.73,71.625 X3.22@64.48,69.875
A2_F: K4.5 X1.63 | length 13.1
  Middle Layer 1 w0.3: X1.63@91.35,57.695 91.35,62.787 96.377,67.814 96.377,68.684 K4.5@96.39,68.697
A2_KY: D2.29 X4.29 | length 14.1
  Bottom Layer w0.1: D2.29@24.34,17 24.34,14.785 29.625,9.5 32.235,9.5 X4.29@33.495,8.24
A2_KY2: D3.22 X2.22 | length 12.2
  Bottom Layer w0.1: X2.22@60.105,6.75 61.625,8.27 D3.22@61.625,18.311
A2_MC: D1.11X3 R55.2 | length 26.8
  Bottom Layer w0.3: R55.2@103.7,70.75 103.825,70.625 113,70.625 114.75,72.375 114.75,80.435 D1.11X3@119.61,85.295
DI1_MC: D1.21X3 X1.IN-OUT1 | length 32.9
  Middle Layer 2 w0.3: D1.21X3@119.61,72.595 120.86,73.845 123.97,73.845 126.5,76.375 126.5,94.125 128.16,95.785 130.74,95.785 X1.IN-OUT1@131.99,94.535
DO1_MC: D1.25X3 X1.OUT1 | length 32.6
  Middle Layer 2 w0.3: D1.25X3@119.61,67.515 120.86,68.765 123.39,68.765 127,72.375 127,92.085 X1.OUT1@129.45,94.535
DO2_MC: D1.23X3 X1.OUT2 | length 38.2
  Middle Layer 2 w0.3: D1.23X3@119.61,70.055 117.75,68.195 117.75,66.875 118.36,66.265 123.64,66.265 127.5,70.125 127.5,90.045 X1.OUT2@129.45,91.995
GND: C1.2 C2.2 C3.2 C4.2 C5.2 C6.2 C7.2 D1.1X2 D1.2X2 D1.3X2 D1.5X2 D1.7X2 D1.27X3 GND.1 R7.2 R8.2 R62.2 R63.2 READ.2 RELE1.2 RELE2.2 RELE3.2 RELE4.2 VT1.2 VT2.2 VT3.2 VT4.2 WRITE.2 X1.GND X3.4 X3.16 X3.27 X3.32 X3.44 X3.55 X3.57 X5.6 X5.11 X5.23 X5.34 X5.39 X5.51
  other v1: 51.125,51.25 50,51.875 95.5,51.875 100,51.875 104.5,51.875 111.125,51.875 117.75,51.875 122.25,51.875 126.75,51.875 131.25,51.875 135.75,51.875 140.5,51.875 50,53 95.5,53.125 98.375,53.125 75,53.375 77.375,53.375 80,53.375 85.25,53.375 90.25,53.5 92.875,53.5 50,54.125 98.375,54.875 50,55.25 2.75,55.375 7.125,55.375 11.625,55.375 16.125,55.375 20.5,55.375 25,55.375 29.5,55.375 34,55.375 38.5,55.375 43,55.375 47.375,55.375 140.5,55.5 111.625,55.875 50,56.375 98.375,56.625 50,57.5 113.75,58 98.375,58.375 50,58.625 2.75,58.875 48.875,59.75 92.625,60.125 94.875,60.125 96.625,60.125 98.375,60.125 100.125,60.125 103.25,60.125 106.375,60.125 109.5,60.125 111.625,60.125 115.875,60.125 25.25,60.875 26.375,60.875 27.5,60.875 28.625,60.875 29.75,60.875 30.875,60.875 32,60.875 33.125,60.875 34.25,60.875 35.375,60.875 36.5,60.875 37.625,60.875 38.75,60.875 39.875,60.875 41,60.875 42.125,60.875 43.25,60.875 44.375,60.875 45.5,60.875 46.625,60.875 47.75,60.875 118,61.125 121.125,61.125 124.25,61.125 92.625,61.25 24.125,62 90.375,62 109.125,62.25 110.875,62.25 112.5,62.25 124.75,62.25 127,62.25 131.5,62.25 136,62.25 140.5,62.25 2.75,62.375 23,63.125 89.5,63.125 111.75,63.25 113.625,63.25 120.875,63.375 103.625,63.625 117.625,63.625 112.625,64 21.875,64.25 89.5,64.25 111.5,64.75 43.125,65.25 44.5,65.25 45.875,65.25 47.125,65.25 49.875,65.25 79.75,65.25 20.75,65.375 124.125,65.5 77.125,65.625 80.75,66.125 19.625,66.5 44.5,66.625 45.875,66.625 47.125,66.625 49.875,66.625 125.375,66.625 77.125,66.875 78.5,66.875 97.875,66.875 100.375,66.875 81.625,67 113.375,67.375 18.5,67.625 126.375,67.625 2.75,67.75 5.625,67.75 45.875,68 47.125,68 49.875,68 77.125,68.125 78.5,68.25 79.75,68.375 103.5,68.625 91.75,68.75 113.375,68.75 136,69 140.5,69 49.875,69.25 77.125,69.375 8.5,69.5 11.75,69.5 78.5,69.625 110.375,69.75 111.375,69.75 108.125,69.875 29.25,70.375 30.375,70.375 32.625,70.375 47.375,70.375 11.75,70.625 13.375,70.625 15,70.625 49.875,70.625 77.125,70.625 38.5,70.75 55.25,70.875 91.75,70.875 2.75,71.375 5.625,71.375 28.375,71.375 30.375,71.5 82,71.625 27.375,72.375 30.375,72.375 90.875,72.75 95.125,72.75 96.75,72.75 98.125,72.75 99.875,72.75 101.5,72.75 103.375,72.75 105.25,72.75 107.125,72.75 110.25,72.75 112.125,72.75 26.375,73.375 28.625,73.375 30.375,73.375 91.625,73.5 95.125,73.875 96.75,73.875 98.125,73.875 99.875,73.875 74.125,74.25 76.75,74.25 79.375,74.25 82,74.25 25.375,74.375 92.5,74.375 112.125,74.625 2.75,74.875 5.625,74.875 33,75.125 24.5,75.25 26.75,75.25 28.625,75.25 108,75.75 136,75.75 140.5,75.75 23.5,76.375 110.625,76.625 103.75,77 125.625,77 22.625,77.375 24.875,77.375 26.625,77.375 30.125,77.5 28.875,77.875 113.625,78.125 21.75,78.25 58.5,78.25 2.75,78.375 5.625,78.375 41.75,78.375 125.625,78.375 27.625,79 58.5,79.5 28.875,79.625 40.75,79.625 59.875,79.625 125.625,79.625 26.875,79.875 41.75,80.5 113.423,80.54 58.5,80.75 59.875,80.75 61.125,80.75 100.375,80.75 97.5,80.875 40.75,81 90.25,81.25 28.875,81.375 2.75,81.875 5.625,81.875 40.75,82.125 59.875,82.125 61.125,82.125 103.625,82.125 111.875,82.375 90.25,82.5 91.75,82.5 136,82.5 140.5,82.5 62.25,82.625 110.625,83 113,83 28.875,83.125 58.5,83.375 91.5,83.625 20.125,83.75 23.75,83.75 92.625,84.5 26.5,84.875 28.875,84.875 58.627,85.123 59.877,85.123 62.502,85.123 65.127,85.123 69.002,85.123 71.627,85.123 72.877,85.123 2.75,85.375 5.625,85.375 90.125,85.375 100,85.5 102.125,85.5 104.125,85.5 106,85.5 108,85.5 110.625,85.5 113.375,85.875 26.5,86.625 28.875,86.625 124.75,86.875 136,87 140.5,87 90.125,87.25 91.25,87.25 92.375,87.25 124.75,88.125 26.5,88.375 28.875,88.375 58.5,88.375 59.875,88.375 63.75,88.375 66.375,88.375 69,88.375 72.25,88.375 73.375,88.375 113.375,88.375 108,88.75 2.75,88.875 5.625,88.875 90.125,89.125 110.625,89.25 103.75,90 26.5,90.125 28.875,90.125 18.875,90.25 112.25,90.75 90.125,91.5 110.625,91.5 136,91.5 140.5,91.5 58.625,91.75 61.25,91.75 63.875,91.75 66.5,91.75 69.125,91.75 70.5,91.75 73.25,91.75 26.5,91.875 28.875,91.875 16.75,92.25 18.875,92.25 2.75,92.375 5.625,92.5 26.5,93.625 28.875,93.625 16.75,94.25 18.875,94.25 124.375,94.5 72.75,95 74.375,95 75.75,95 57.125,95.125 59.75,95.125 62.375,95.125 65,95.125 67.625,95.125 70.25,95.125 92.25,95.125 26.5,95.375 28.875,95.375 103.375,95.375 2.75,95.875 5.625,95.875 110.625,96 136,96 140.5,96 16.75,96.25 18.875,96.25 26.5,97.125 28.875,97.125 126.875,97.625 75.5,98.125 78.125,98.125 80.875,98.125 16.75,98.25 18.875,98.25 101.5,98.25 103.75,98.25 106,98.25 107.875,98.25 110.625,98.25 113,98.25 126,98.375 127.625,98.375 26.5,98.875 28.875,98.875 22.5,99 2.75,99.375 75.625,99.375 78.125,99.375 80.875,99.375 99.875,99.625 119.625,100 91.75,100.125 93.125,100.125 95.5,100.125 98,100.125 16.75,100.25 18.875,100.25 106,100.5 107.875,100.5 110.625,100.5 113,100.5 115.25,100.5 121.125,100.5 136,100.5 140.5,100.5 26.5,100.625 28.875,100.625 78.125,100.625 80.875,100.625 87.75,100.75 22.5,101 50.25,101.25 91.75,101.25 78.125,101.875 80.875,102 121.125,102 16.75,102.25 18.875,102.25 89.625,102.625 26.5,102.75 2.75,103 22.5,103 103.625,103.25 48.125,103.375 54.125,103.375 80.875,103.375 113,103.625 115.25,103.625 117.5,103.625 119.75,103.625 16.75,104.25 18.875,104.25 22.5,105 121.125,105 136,105 140.5,105 46.125,105.5 2.75,106.5 52.25,106.625 100.25,107.125 97.5,107.25 44.125,107.375 46.125,107.5 103.5,108.5 112.375,108.625 114.625,108.625 116.875,108.625 119.125,108.625 127.625,108.625 123.5,109.25 28,109.375 108.625,109.375 30.125,109.5 32.125,109.5 34.125,109.5 36.125,109.5 38.125,109.5 40.125,109.5 42.125,109.5 44.125,109.5 46.125,109.5 48.125,109.5 129.25,109.5 131.5,109.5 133.75,109.5 136,109.5 138.25,109.5 140.5,109.5 142.5,109.5 2.75,110 6.5,110 10.25,110 15,110 17.5,110 112.375,110.875 114.625,110.875 11.125,111 28,111.625 127.75,111.625 131,111.625 133.625,111.625 142.5,111.625 48.125,111.75 12,111.875 15,112.5 17.5,112.5 12.875,112.75 98.875,113.125 101.125,113.125 103.375,113.125 105.625,113.125 107.875,113.125 110.125,113.125 112.375,113.125 114.625,113.125 2.75,113.5 6.5,113.5 9.25,113.5 13.75,113.625 15.375,113.625 16.875,113.625 18.5,113.625 19.875,113.625 21.25,113.625 22.625,113.625 53,113.625 142.5,113.75 28,113.875 48.125,114 98.875,115.375 53,115.875 142.5,115.875 12.25,116.125 14.5,116.125 16.75,116.125 19,116.125 21.25,116.125 23.5,116.125 25.75,116.125 28,116.125 48.125,116.25 98.875,117.625 117,118 119.125,118 121.25,118 123.375,118 125.5,118 127.625,118 129.75,118 131.875,118 134,118 136.125,118 138.25,118 140.375,118 142.5,118 48.125,118.5 50.375,118.5 48.125,119.875 50.375,119.875 52.625,119.875 54.875,119.875 57.125,119.875 60.875,119.875 63.375,119.875 66,119.875 68.625,119.875 71.125,119.875 73.75,119.875 76,119.875 78.75,119.875 81.25,119.875 83.75,119.875 86.125,119.875 88.875,119.875 91.375,119.875 93.875,119.875 96.625,119.875 98.875,119.875
GND_KY2: D3.57 X2.57
  other v1: 49.25,2.25 54.125,2.25 57.375,2.25 60.625,2.25 63.875,2.25 70.375,2.25 73.625,2.25 49.25,5.125 73.625,5.5 49.25,8.375 73.625,8.75 73.625,10.375 76.875,10.375 49.25,11.625 70.625,13.5 53,14.625 69.125,14.875 44.125,15.25 78.5,15.25 54.375,16 55.625,17.25 66.25,17.625 78.5,18.5 44.125,20.125 59,20.5 61.375,20.5 63.75,20.5 78.5,21.75 59,22.625 63.75,22.75 44.125,23.375 59,24.875 61.375,24.875 63.75,24.875 78.5,25 44.125,26.625 56.625,27.5 78.5,28.25 67.125,28.375 68.625,29.75 44.125,29.875 53.625,30.5 70.25,31.5 52.5,31.875 44.125,33.125 78.5,33.125 44.125,34.75 44.125,36.375 78.5,36.375 44.125,37.75 44.125,39.125 78.5,39.625 44.125,40.875 72,42.875 75.25,42.875 78.5,42.875 46,43.375 49.25,43.375 52.5,43.375 59,43.375 62.25,43.375 65.5,43.375 68.75,43.375
INT_MC: D1.4X2 R50.1 | length 2.5
  Top Layer w0.5: D1.4X2@137.39,113.235 137.42,113.205 137.42,110.78 R50.1@137.45,110.75
INT_PCA: INT.1 R50.2 R51.1 X3.48 X5.55 | length 134.9
  Top Layer w0.3: INT.1@23.25,111.75 23.25,111.061 23.497,110.814 23.497,110.753 28,106.25 34.755,106.25 X5.55@36.62,104.385
  Middle Layer 2 w0.2: X5.55@36.62,104.385 40.852,104.385 47.537,97.7 66.575,97.7 69.56,100.685 69.56,102.19 68.25,103.5 68.25,105.125 69.7,106.575 87.8,106.575 92.625,101.75 119.625,101.75 128.625,110.75 v1(135.55,110.75)
  Bottom Layer w0.5: R51.1@69.55,99.375 69.555,99.38 69.555,101.87 X3.48@69.56,101.875
INT_PCA_KY: D2.55 X4.55 | length 16.8
  Bottom Layer w0.1: D2.55@26.34,30 25.125,31.215 25.125,35.5 29.625,40 32.235,40 X4.55@33.495,41.26
INT_PCA_KY2: D3.48 X2.48 | length 12.8
  Bottom Layer w0.1: D3.48@62.125,27.19 62.125,35.69 X2.48@65.185,38.75
IO0_0: IO0_0.2 X1.9 X3.52 X5.3 | length 96.6
  Top Layer w0.2: IO0_0.2@62.667,108.6 63.125,108.142 63.125,103.23 X3.52@64.48,101.875
  Middle Layer 1 w0.2: X3.52@64.48,101.875 65.75,103.145 65.75,105.402 68.098,107.75 72.25,107.75 76.11,111.61 X1.9@76.11,113.595
  Middle Layer 2 w0.2: X5.3@7.38,101.845 6.155,101.845 5.575,102.425 5.575,105.503 7.047,106.975 40.525,106.975 48.2,99.3 64.009,99.3 64.48,99.771 X3.52@64.48,101.875
IO0_0_KY: D2.3 X4.3 | length 17.7
  Bottom Layer w0.1: X4.3@4.255,38.72 5.535,40 7.75,40 15.41,32.34 D2.3@15.41,29.5
IO0_0_KY2: D3.52 X2.52 | length 11.6
  Bottom Layer w0.1: D3.52@60.105,27.172 X2.52@60.105,38.75
IO0_1: IO0_1.2 X1.10 X3.53 X5.4 | length 97.9
  Top Layer w0.2: IO0_1.2@60.444,108.6 60.494,108.6 60.994,108.1 60.994,108.05 61.94,107.104 X3.53@61.94,104.415
  Middle Layer 1 w0.2: X3.53@61.94,104.415 65.725,108.2 70.45,108.2 73.57,111.32 X1.10@73.57,113.595
  Middle Layer 2 w0.2: X5.4@9.92,101.845 8.575,100.5 6.25,100.5 5.175,101.575 5.175,105.669 6.881,107.375 40.691,107.375 48.366,99.7 62.2,99.7 63.125,100.625 63.125,103.23 X3.53@61.94,104.415
IO0_1_KY: D2.4 X4.4 | length 11.6
  Bottom Layer w0.1: X4.4@6.795,38.72 9.224,36.291 9.224,31.186 D2.4@11.41,29
IO0_1_KY2: D3.53 X2.53 | length 14.7
  Top Layer w0.1: X2.53@57.565,41.29 56.25,39.975 56.25,31.955 D3.53@59.625,28.58
IO0_2: IO0_2.2 X1.11 X3.54 X5.5 | length 98.9
  Top Layer w0.2: IO0_2.2@58.222,108.6 58.272,108.6 58.772,108.1 58.772,108.05 60.625,106.197 60.625,103.19 X3.54@61.94,101.875
  Middle Layer 1 w0.2: X3.54@61.94,101.875 60.625,103.19 60.625,105.125 64.1,108.6 68.725,108.6 71.03,110.905 X1.11@71.03,113.595
  Middle Layer 2 w0.2: X5.5@7.38,99.305 7.357,99.328 5.672,99.328 4.775,100.225 4.775,105.834 6.716,107.775 40.856,107.775 48.531,100.1 58.191,100.1 58.216,100.125 61.625,100.125 61.94,100.44 X3.54@61.94,101.875
IO0_2_KY: D2.5 X4.5 | length 13.9
  Top Layer w0.1: X4.5@4.255,36.18 5.56,34.875 8.25,34.875 10.125,33 10.125,30.375 10.75,29.75 12.16,29.75 D2.5@13.41,28.5
IO0_2_KY2: D3.54 X2.54 | length 12.2
  Bottom Layer w0.1: X2.54@57.565,38.75 59.125,37.19 D3.54@59.125,27.162
IO0_3: IO0_3.2 X1.12 X3.56 X5.7 | length 98.8
  Top Layer w0.2: IO0_3.2@56,108.6 56.05,108.6 56.55,108.1 56.55,108.05 58.125,106.475 58.125,103.15 X3.56@59.4,101.875
  Middle Layer 1 w0.2: X3.56@59.4,101.875 58.125,103.15 58.125,105.125 62,109 67,109 68.49,110.49 X1.12@68.49,113.595
  Middle Layer 2 w0.2: X5.7@7.38,96.765 5.735,96.765 4.375,98.125 4.375,106 6.55,108.175 41.022,108.175 48.697,100.5 58.025,100.5 X3.56@59.4,101.875
IO0_3_KY: D2.7 X4.7 | length 11.2
  Top Layer w0.1: X4.7@4.255,33.64 5.595,32.3 7.825,32.3 8.875,31.25 8.875,28.625 10,27.5 D2.7@11.41,27.5
IO0_3_KY2: D3.56 X2.56 | length 13
  Bottom Layer w0.1: X2.56@55.025,38.75 58.125,35.65 D3.56@58.125,27.055
IO0_4: IO0_4.2 X1.13 X3.1 X5.8 | length 125.9
  Top Layer w0.2: IO0_4.2@46.039,97.25 48.225,97.25 X3.1@50.71,94.765
  Middle Layer 1 w0.2: X5.8@9.92,96.765 10.063,96.622 11.003,96.622 18.875,88.75 18.875,79.625 28.875,69.625 39.152,69.625 43.25,73.723 43.25,88.051 49.688,94.489 50.434,94.489 52.85,96.905 52.85,101.078 50.2,103.728 50.2,116.499 52.401,118.7 63.425,118.7 64.755,117.37 64.755,114.79 X1.13@65.95,113.595
IO0_4_KY: D2.8 X4.8 | length 11
  Top Layer w0.1: X4.8@6.795,33.64 7.12,33.315 7.935,33.315 9.291,31.959 9.291,29.209 10.25,28.25 12.16,28.25 D2.8@13.41,27
IO0_4_KY2: D3.1 X2.1 | length 11.5
  Top Layer w0.1: X2.1@46.335,31.64 47.6,30.375 50.92,30.375 D3.1@55.405,25.89
IO0_5: IO0_5.2 X1.14 X3.2 X5.9 | length 128.4
  Top Layer w0.2: IO0_5.2@46.325,95.014 46.325,94.964 46.825,94.464 46.875,94.464 47.839,93.5 51.985,93.5 X3.2@53.25,94.765
  Middle Layer 1 w0.2: X5.9@7.38,94.225 8.655,95.5 10.5,95.5 18.475,87.525 18.475,79.459 28.709,69.225 39.318,69.225 45.4,75.307 45.4,89.025 49.875,93.5 51.375,93.5 52.334,94.459 52.944,94.459 X3.2@53.25,94.765 53.25,101.244 50.6,103.894 50.6,116.334 52.566,118.3 61.2,118.3 62.125,117.375 62.125,114.88 X1.14@63.41,113.595
IO0_5_KY: D2.9 X4.9 | length 13.1
  Bottom Layer w0.1: X4.9@4.255,31.1 5.605,29.75 8,29.75 9.5,28.25 12.25,28.25 12.75,27.75 14.16,27.75 D2.9@15.41,26.5
IO0_5_KY2: D3.2 X2.2 | length 10.7
  Bottom Layer w0.1: X2.2@48.875,31.64 50.68,31.64 D3.2@56.945,25.375
IO0_6: IO0_6.2 X1.15 X3.3 X5.10 | length 119.5
  Top Layer w0.2: IO0_6.2@46.325,92.778 46.728,92.375 50.56,92.375 X3.3@50.71,92.225
  Middle Layer 1 w0.2: X5.10@9.92,94.225 18.059,86.086 18.059,79.309 28.544,68.825 39.484,68.825 45.8,75.141 45.8,87.8 49.819,91.819 49.871,91.819 50.277,92.225 51.143,92.225 51.534,92.616 51.616,92.616 52.5,93.5 54.125,93.5 55.125,94.5 55.125,99.934 51,104.059 51,116.168 52.732,117.9 58.975,117.9 59.625,117.25 59.625,114.84 X1.15@60.87,113.595
IO0_6_KY: D2.10 X4.10 | length 8.5
  Top Layer w0.1: X4.10@6.795,31.1 7.9,31.1 8.375,30.625 8.375,27.625 10,26 D2.10@11.41,26
IO0_6_KY2: D3.3 X2.3 | length 10.8
  Top Layer w0.1: X2.3@46.335,29.1 47.56,27.875 52.42,27.875 D3.3@55.42,24.875